# Altium PCB R20_PCBM.PcbDoc (part 1 of 2)
Units mm, origin at the board's own origin, x right, y up, seen from the top; angles counter-clockwise.
Board outline 52 x 61 mm, 4 copper layers (Top Layer, Mid-Layer 1, Mid-Layer 2, Bottom Layer); 64 components, 44 nets, 197 pads, 629 vias.
Unrouted connection lines stored in the file: 1.
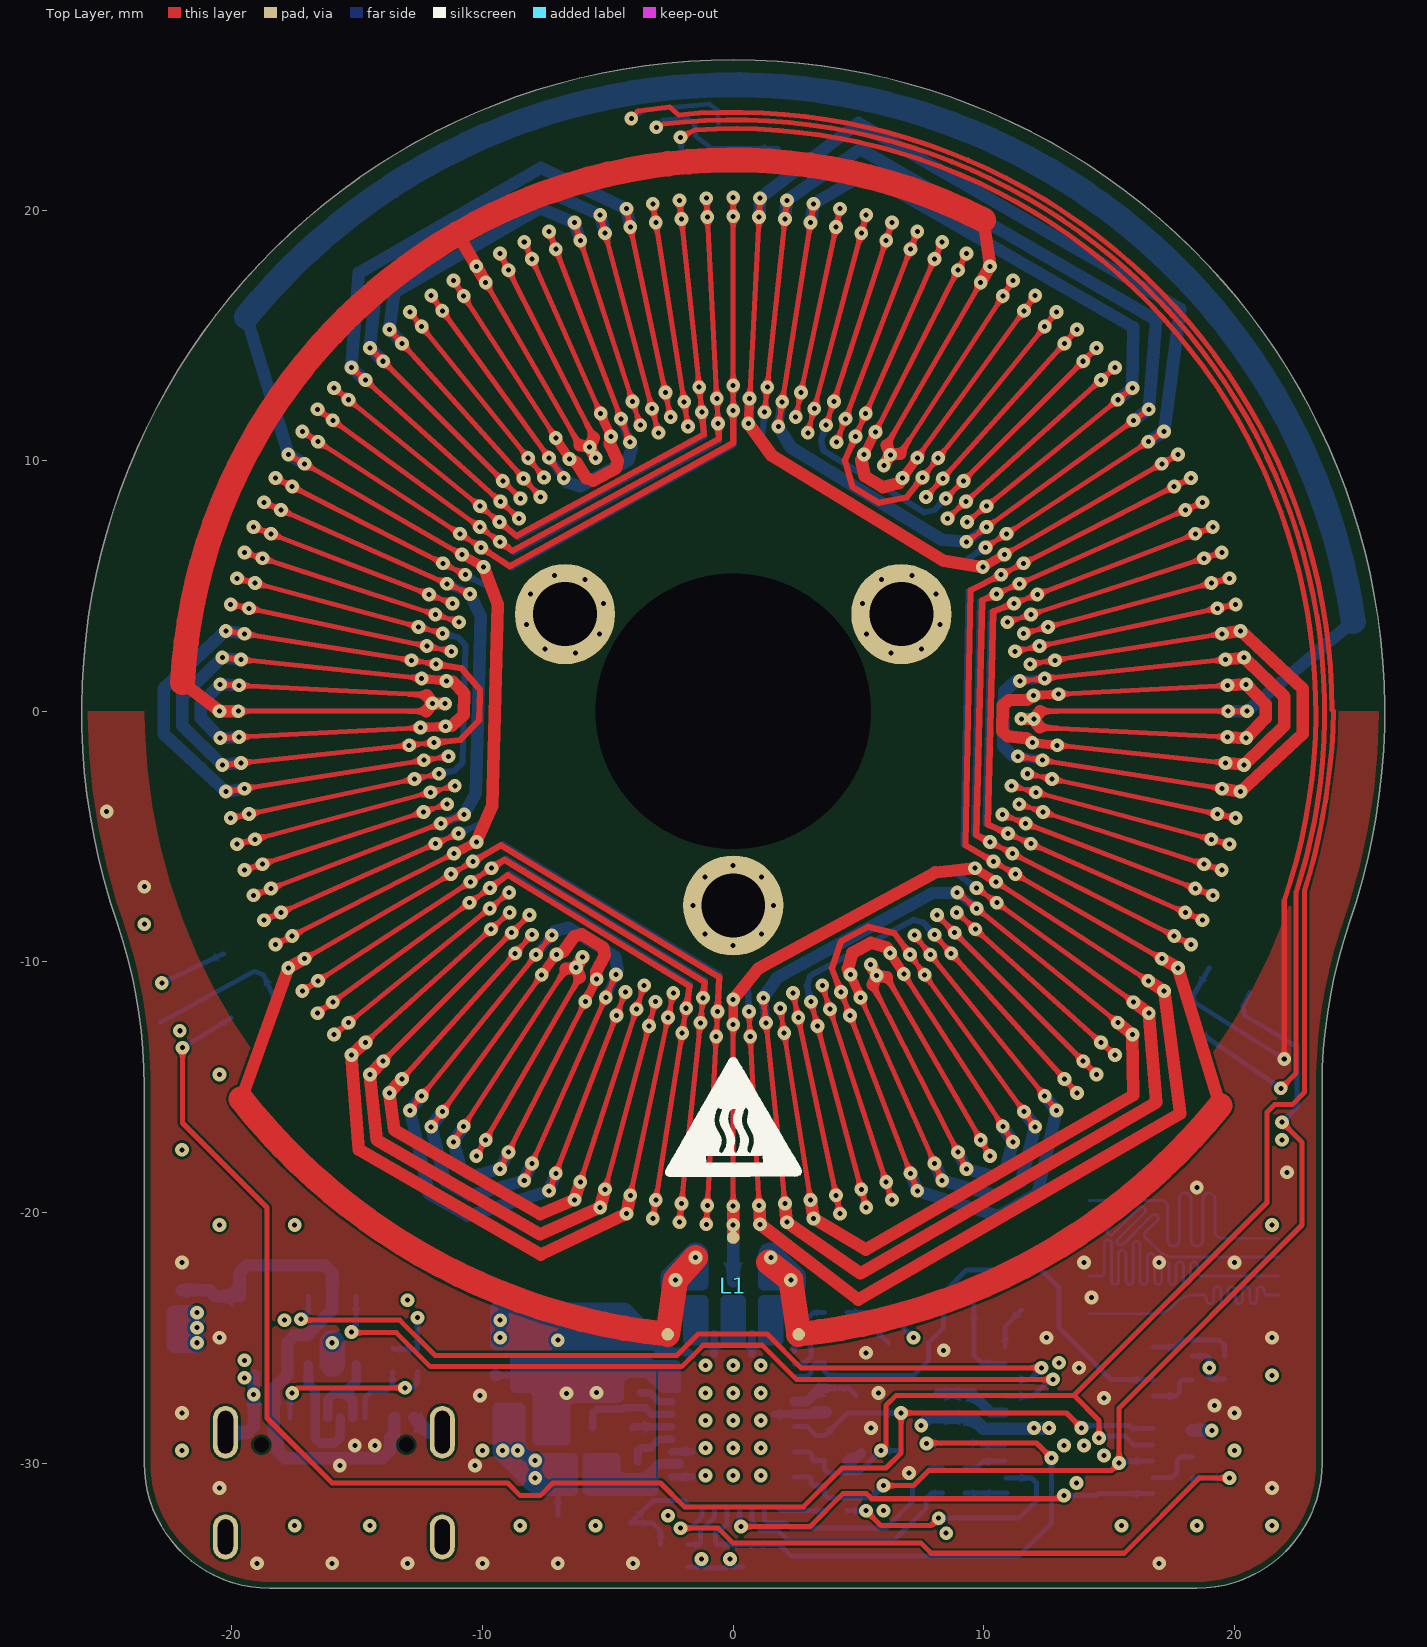
[diagram p0: Top Layer view]
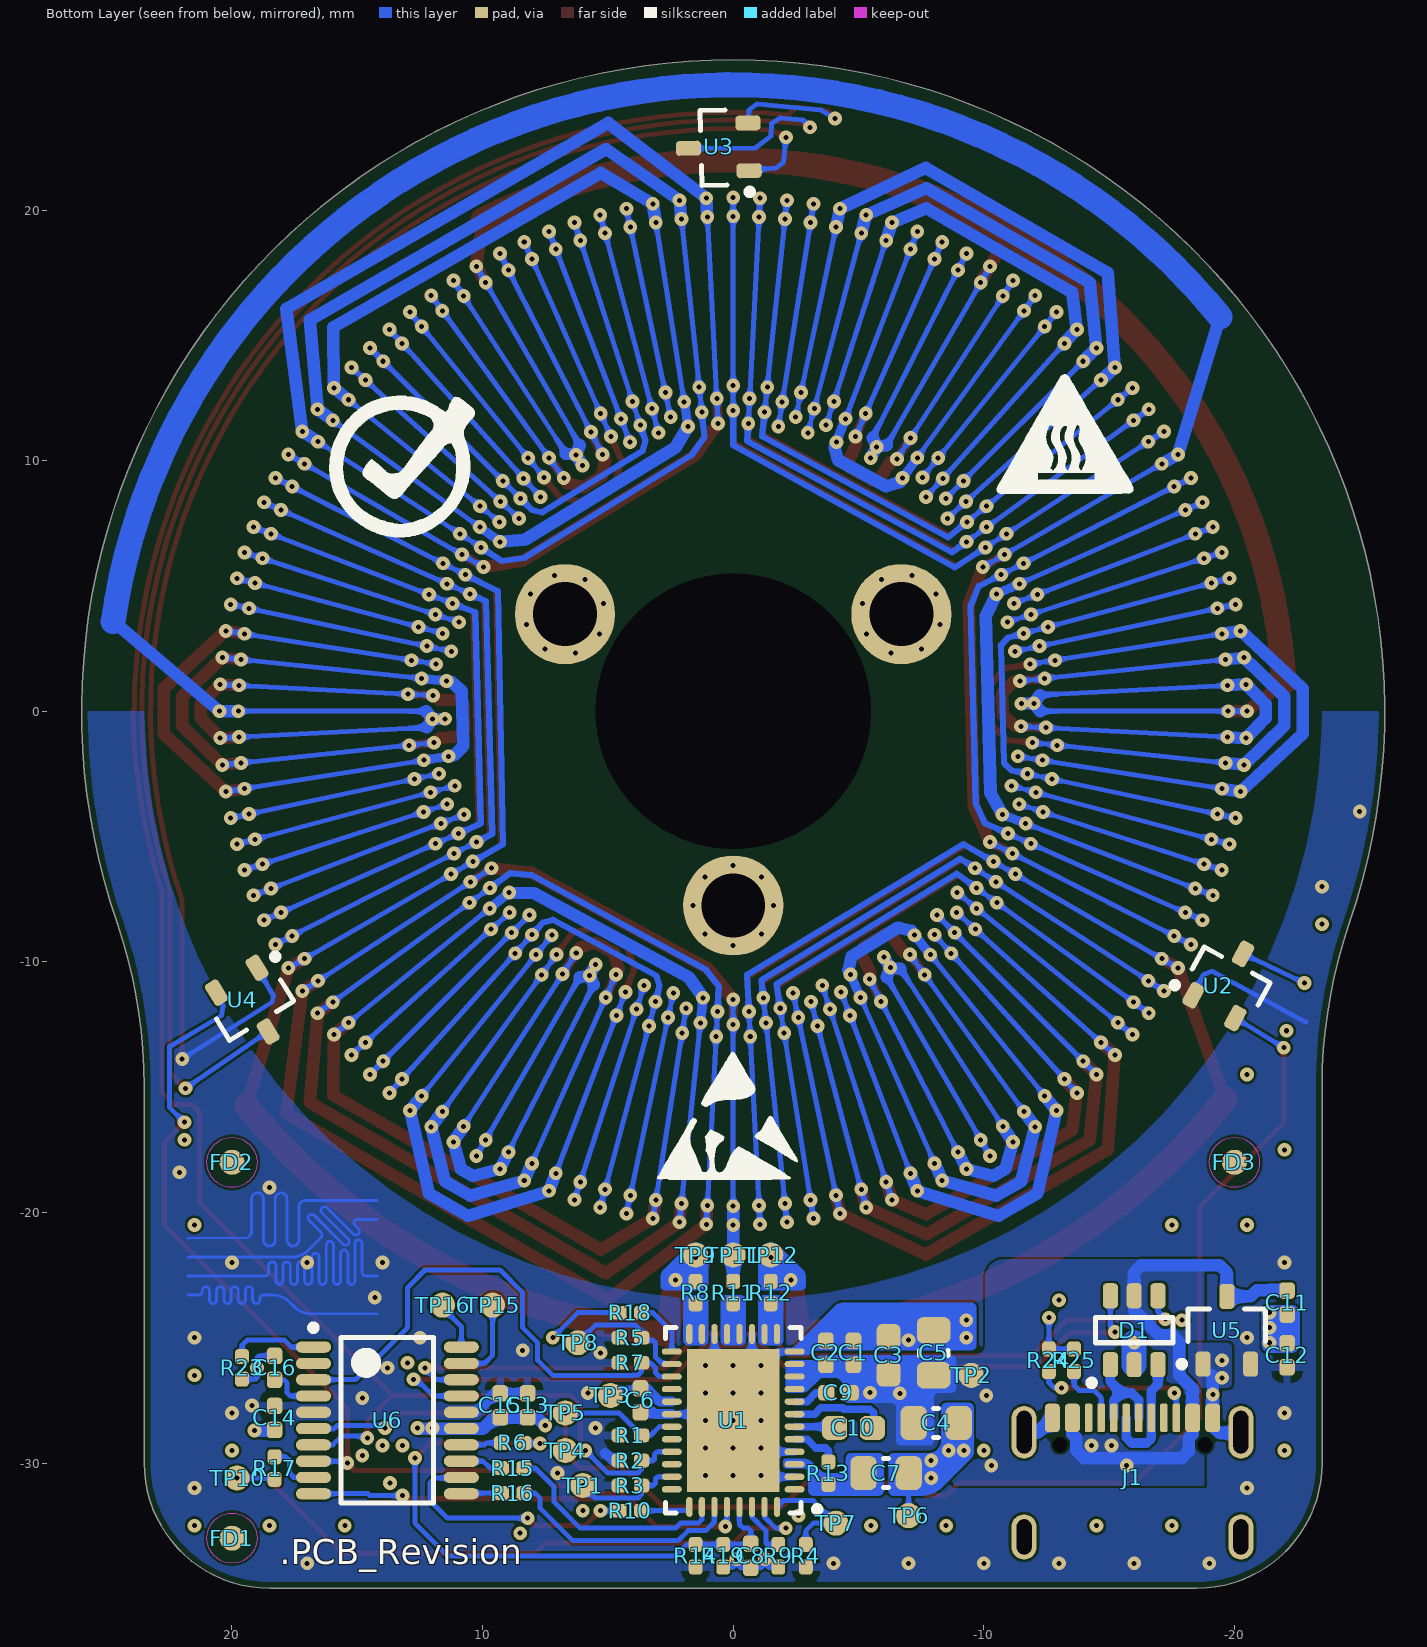
[diagram p1: Bottom Layer view, seen from below]
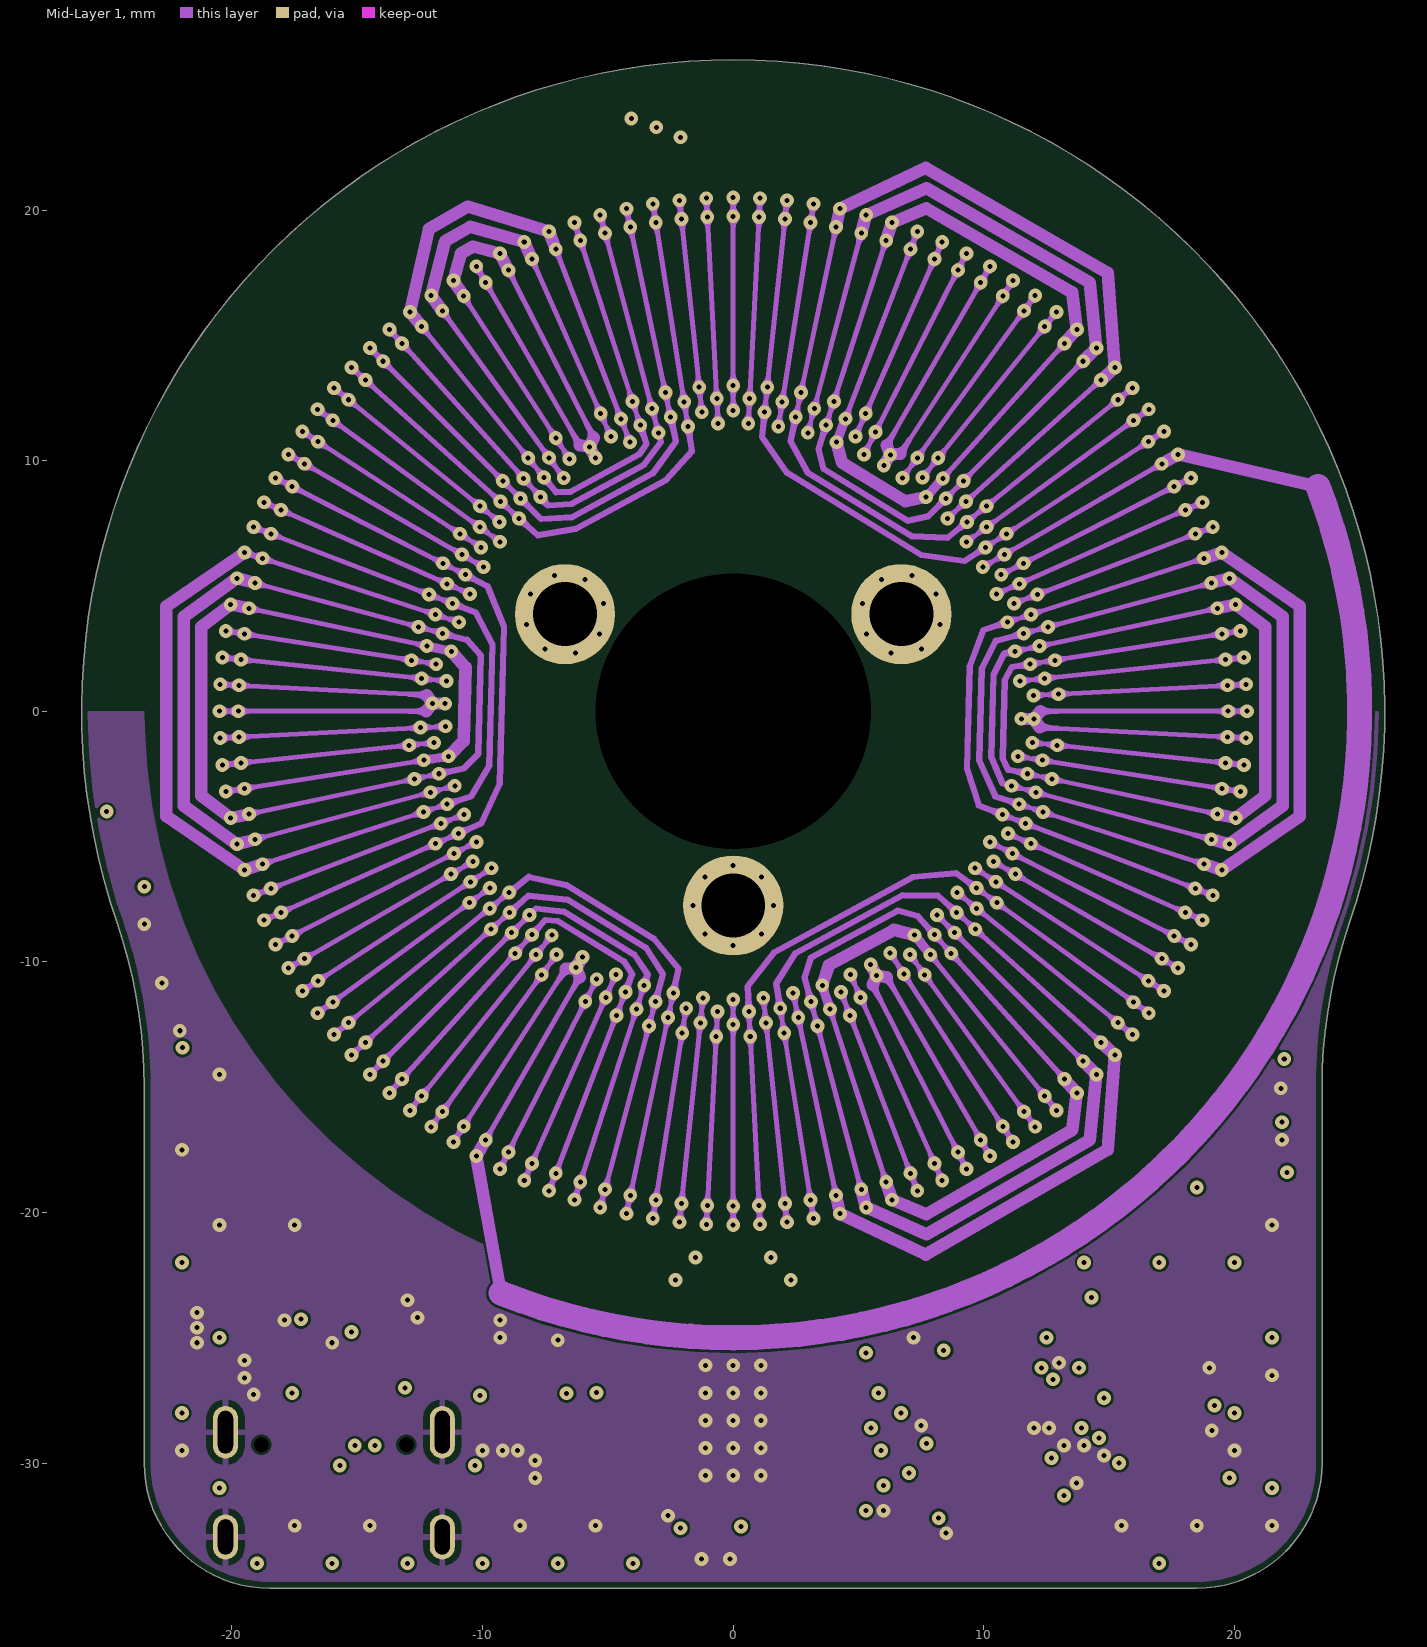
[diagram p2: Mid-Layer 1]
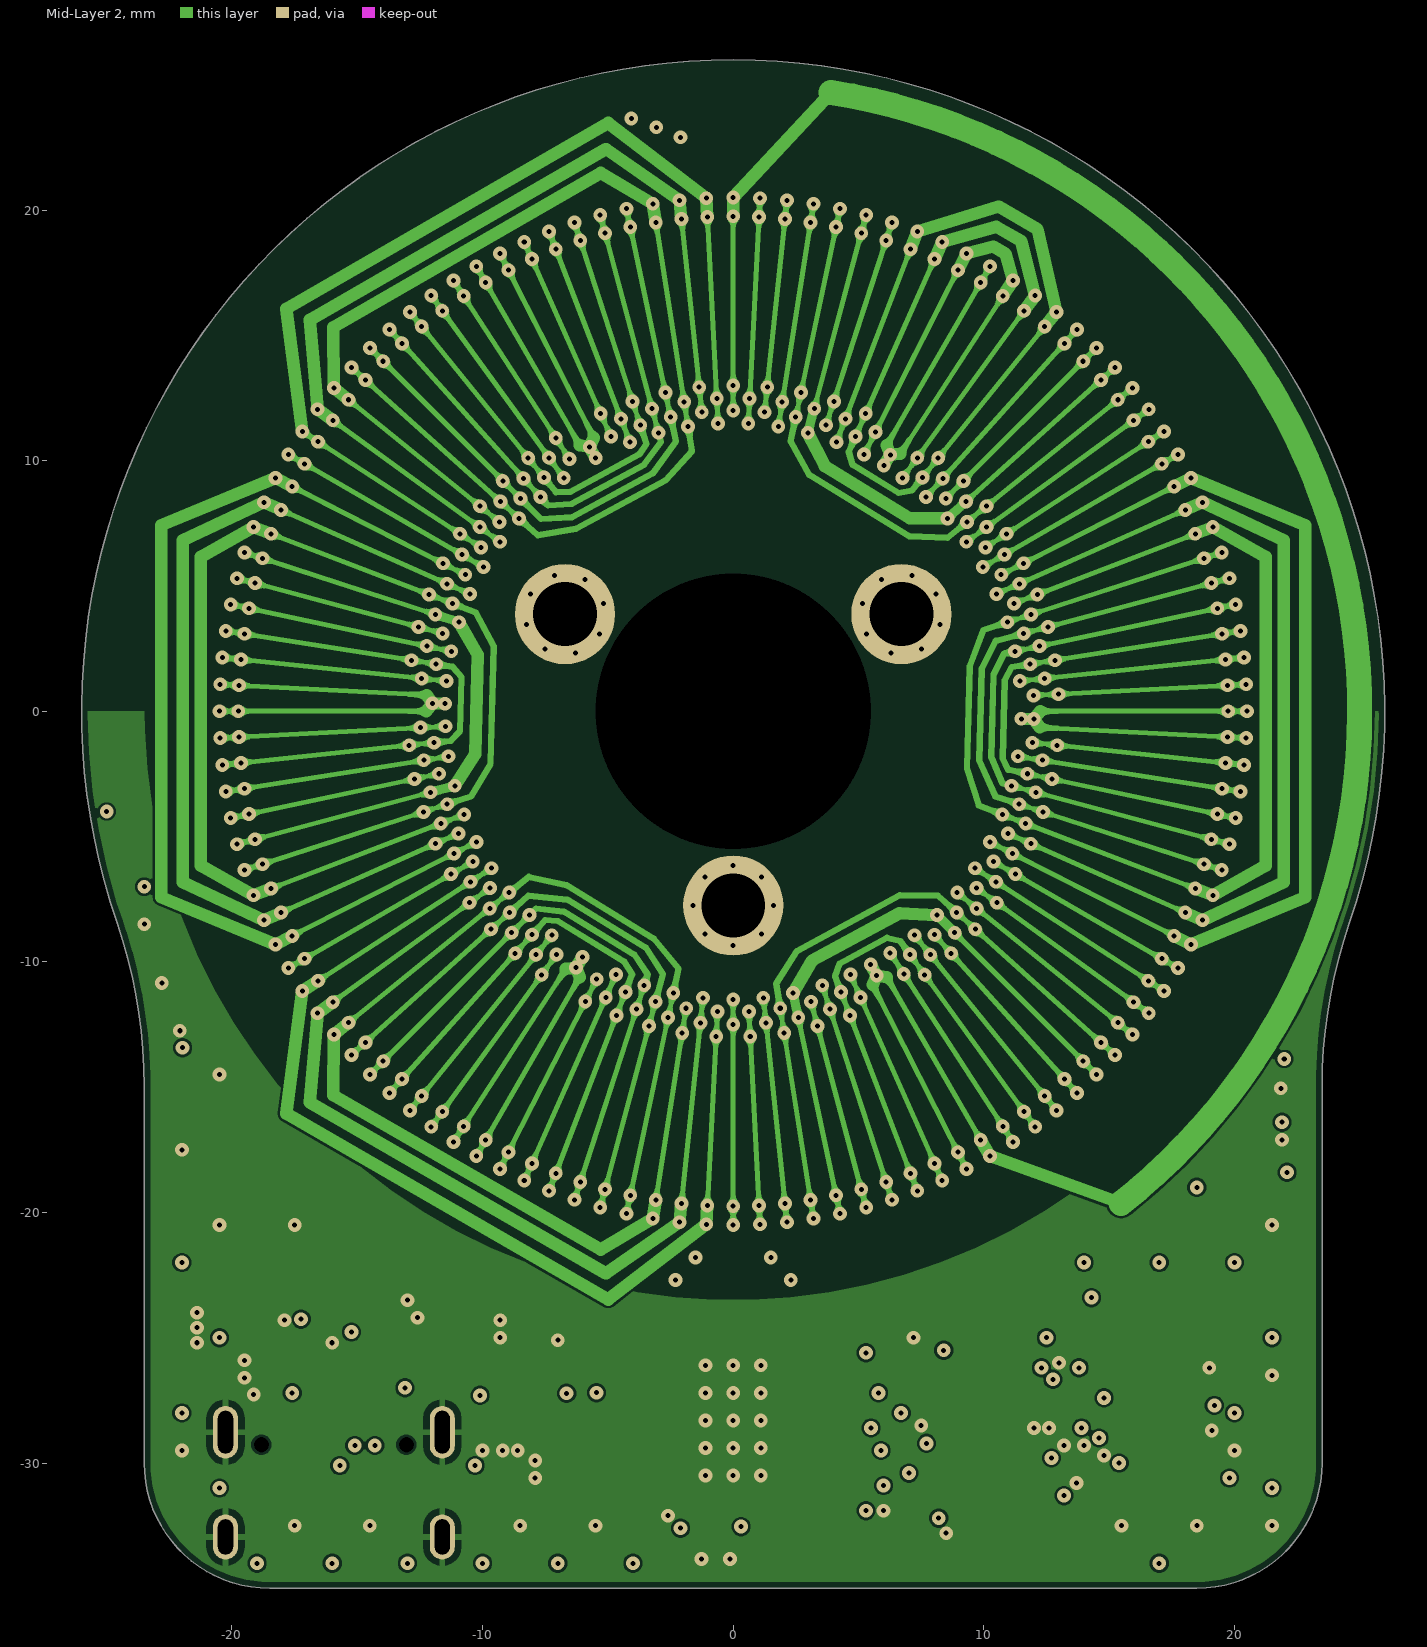
[diagram p3: Mid-Layer 2]
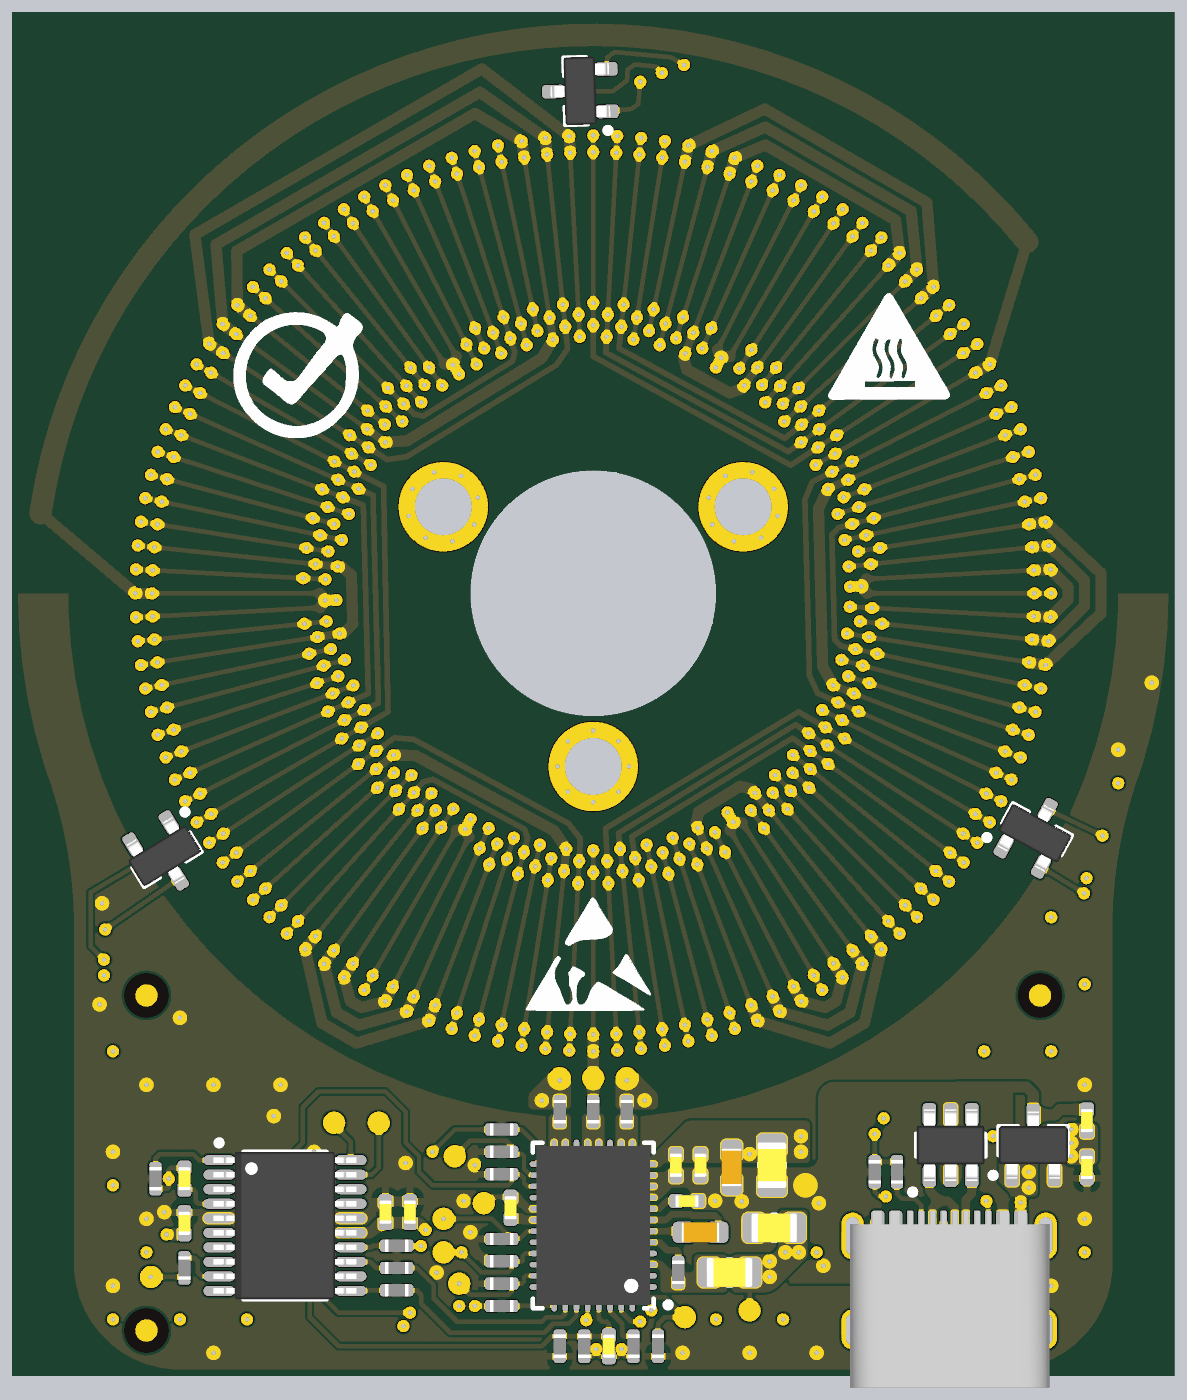
[diagram p5: 3D render of the assembled board from below, using the file's embedded part models]

## Layer stack, top to bottom
Top Solder: solder mask 0.0102, Solder Resist, Dk 3.5
Top Layer: signal copper 0.0356
Dielectric 1: dielectric 0.32, FR-4, Dk 4.8
Mid-Layer 1: signal copper 0.0356
Dielectric3: dielectric 0.32, FR-4, Dk 4.8
Mid-Layer 2: signal copper 0.0356
Dielectric2: dielectric 0.32, FR-4, Dk 4.8
Bottom Layer: signal copper 0.0356
Bottom Solder: solder mask 0.0102, Solder Resist, Dk 3.5

## Board outline
-23.5,-30 -23.5,-14.958 ccw(c-43.5,-14.958) -24.587,-8.455 cw(c0,0) 24.587,-8.455 ccw(c43.5,-14.958) 23.5,-14.958 23.5,-30 cw(c18.5,-30) 18.5,-35 -18.5,-35 cw(c-18.5,-30)

## Design rules (kind name [scope] priority, off if disabled: settings)
BoardOutlineClearance [All] p1: gap=0.254 ignorepadtopadclearanceinfootprint=FALSE
Clearance [not (InComponent('L1') or InNet('A') or InNet('B')    or InNet('C'))] p1: gap=0.1 ignorepadtopadclearanceinfootprint=FALSE
ComponentClearance [All] p1: gap=0 collisioncheckmode=3 verticalgap=2540 showdistances=FALSE
DiffPairsRouting [All] p1: maxlimit=0.5 minlimit=0.2 mostfreqgap=0.254 toplayer_minwidth=0.2 toplayer_maxwidth=0.381 toplayer_prefwidth=0.381 midlayer1_minwidth=0.2 midlayer1_maxwidth=0.381 midlayer1_prefwidth=0.381 midlayer2_minwidth=0.2 midlayer2_maxwidth=0.381 midlayer2_prefwidth=0.381 bottomlayer_minwidth=0.2 bottomlayer_maxwidth=0.381 bottomlayer_prefwidth=0.381 maxuncoupledlength=12.7
HoleSize [All] p1: absolutevalues=TRUE maxlimit=11 minlimit=0.2 maxpercent=80.000 minpercent=20.000
HoleToHoleClearance [All] p1: gap=0.2 allowstackedmicrovias=TRUE
MinimumSolderMaskSliver [All] p1: minsoldermaskwidth=0.1
NetAntennae [not (InComponent('L1') or InNet('A') or InNet('B')    or InNet('C'))] p1: netantennaetolerance=0
PolygonConnect PolygonConnect_TR [HasFootprint('C0402') or HasFootprint('C0603') or HasFootprint('R*') or IsThruPin] p1: connectstyle=Relief reliefconductorwidth=0.3 reliefentries=4 polygonreliefangle="90 Angle" airgapwidth=0.3
PolygonConnect [All] p2: connectstyle=Direct reliefconductorwidth=0.254 reliefentries=4 polygonreliefangle="90 Angle" airgapwidth=0.254
RoutingVias [All] p1: holewidth=0.3 width=0.7 viastyle="Through Hole" minholewidth=0.2 minwidth=0.55 maxholewidth=0.3 maxwidth=0.7
ShortCircuit [not (InComponent('L1') or InNet('A') or InNet('B')    or InNet('C')) vs not (InComponent('L1') or InNet('A') or InNet('B')    or InNet('C'))] p1: allowed=FALSE
SilkToSilkClearance [All] p1: silktosilkclearance=0
SilkToSolderMaskClearance [IsPad] p1: minsilkscreentomaskgap=0.15 clearancetoexposedcopper=TRUE
SolderMaskExpansion SolderMaskExpansion_via [IsVia] p1: expansion=-0.175 istentingtop=FALSE
SolderMaskExpansion [All] p2: expansion=0.05 istentingtop=FALSE
SupplyNets "Schematic Supply Nets_3" [InNet('+VBUS')] p1: voltage=0.000
SupplyNets "Schematic Supply Nets_2" [InNet('+AVDD')] p2: voltage=0.000
SupplyNets "Schematic Supply Nets_1" [InNet('GND')] p3: voltage=0.000
SupplyNets "Schematic Supply Nets" [InNet('+3V3')] p4: voltage=0.000
UnRoutedNet [not (InComponent('L1') or InNet('A') or InNet('B')    or InNet('C')) AND InAnyNet] p1: checkbadconnections=TRUE
Width [All] p1: maxlimit=1 minlimit=0.2 preferedwidth=0.2
20 further rules are at their usual default settings.

## Classes and differential pairs
differential pair USB_D: +USB_D_P -USB_D_N

## Components (designator, comment, footprint, x,y, rotation, side; value= is the part's Value field where it differs from the comment)
C1 "100n" C0402 -4.8,-25.6 r270 bottom
C2 "100n" C0402 -3.7,-25.6 r270 bottom
C3 "1u" C0603 -6.2,-25.7 r270 bottom
C4 "10u" C0805 -8.1,-28.4 r0 bottom
C5 "10u" C0805 -8,-25.6 r270 bottom
C6 "1u" C0402 3.7,-27.5 r90 bottom
C7 "10u" C0805 -6.1,-30.4 r0 bottom
C8 "100n" C0402 -0.7,-33.7 r90 bottom
C9 "1u" C0402 -4.2,-27.2 r0 bottom
C10 "47n" C0603 -4.8,-28.6 r180 bottom
C11 "1u" C0402 -22.1,-23.6 r90 bottom
C12 "4u7" C0402 -22.1,-25.7 r270 bottom
C13 "100n" C0402 8.2,-27.7 r90 bottom
C14 "100n" C0402 18.3,-28.2 r90 bottom
C15 "10n" C0402 9.3,-27.7 r90 bottom
C16 "100n" C0402 18.3,-26.2 r270 bottom
D1 "USBLC6-2SC6" USBLC6-2SC6 -16,-24.7 r90 bottom
FD1 "Fiducial" Fiducial 20,-33 r180 bottom
FD2 "Fiducial" Fiducial 20,-18 r90 bottom
FD3 "Fiducial" Fiducial -20,-18 r90 bottom
J1 "USB-C female" TYPE-C-31-M-12 -15.934,-35.06 r180 bottom
L1 "L_phase" R20_PCBM_4 0,0 r0 top locked
R1 "10k" R0402 4.1,-28.9 r0 bottom
R2 "10k" R0402 4.1,-29.9 r0 bottom
R3 "10k" R0402 4.1,-30.9 r0 bottom
R4 "10k" R0402 -2.9,-33.7 r270 bottom
R5 "10k" R0402 4.1,-25 r0 bottom
R6 "10k" R0402 8.8,-29.2 r0 bottom
R7 "10k" R0402 4.1,-26 r0 bottom
R8 "0R" R0402 1.5,-23.2 r90 bottom
R9 "10k" R0402 -1.8,-33.7 r90 bottom
R10 "33R" R0402 4.1,-31.9 r0 bottom
R11 "0R" R0402 0,-23.2 r90 bottom
R12 "0R" R0402 -1.5,-23.2 r90 bottom
R13 "22R" R0402 -3.8,-30.4 r270 bottom
R14 "15k" R0402 1.5,-33.7 r270 bottom
R15 "33R" R0402 8.8,-30.2 r180 bottom
R16 "33R" R0402 8.8,-31.2 r180 bottom
R17 "33R" R0402 18.3,-30.2 r270 bottom
R18 "10k" R0402 4.1,-24 r180 bottom
R19 "10k" R0402 0.4,-33.7 r90 bottom
R23 "1k" R0402 19.6,-26.2 r90 bottom
R24 "5k1" R0402 -12.6,-25.9 r270 bottom
R25 "5k1" R0402 -13.6,-25.9 r270 bottom
TP1 "Testing_Point_1mm" TestingPoint_1mm 6,-30.9 r90 bottom
TP2 "Testing_Point_1mm" TestingPoint_1mm -9.5,-26.5 r90 bottom
TP3 "Testing_Point_1mm" TestingPoint_1mm 4.9,-27.3 r90 bottom
TP4 "Testing_Point_1mm" TestingPoint_1mm 6.7,-29.5 r90 bottom
TP5 "Testing_Point_1mm" TestingPoint_1mm 6.7,-28 r90 bottom
TP6 "Testing_Point_1mm" TestingPoint_1mm -7,-32.1 r90 bottom
TP7 "Testing_Point_1mm" TestingPoint_1mm -4.1,-32.4 r90 bottom
TP8 "Testing_Point_1mm" TestingPoint_1mm 6.2,-25.2 r90 bottom
TP9 "Testing_Point_1mm" TestingPoint_1mm 1.5,-21.7 r90 bottom
TP10 "Testing_Point_1mm" TestingPoint_1mm 19.8,-30.6 r90 bottom
TP11 "Testing_Point_1mm" TestingPoint_1mm 0,-21.7 r90 bottom
TP12 "Testing_Point_1mm" TestingPoint_1mm -1.5,-21.7 r90 bottom
TP15 "Testing_Point_1mm" TestingPoint_1mm 9.6,-23.7 r90 bottom
TP16 "Testing_Point_1mm" TestingPoint_1mm 11.6,-23.7 r90 bottom
U1 "MCT8316ZT" QFN50P500X700X100_HS-41N 0,-28.3 r0 bottom
U2 "DRV5015" SOT95P237X112-3N -19.773,-10.736 r118.5 bottom locked
U3 "DRV5015" SOT95P237X112-3N 0.589,22.492 r358.5 bottom locked
U4 "DRV5015" SOT95P237X112-3N 19.184,-11.756 r238.5 bottom locked
U5 "3v3_reg" SOT23_torex -19.7,-24.7 r90 bottom
U6 "STM32F042" TSSOP20_ST 13.8,-28.3 r180 bottom

## Footprints (in the part's own frame and the unit in brackets; to place one, negate y for a bottom-side part, rotate by r counter-clockwise, add the part's x,y. Pads: shape width x height; smd on the part's side, far side on the other; paste and mask are expansions set on the pad)
C0402 [mm] "Chip Capacitor, 2-Leads, Body 1.00x0.50mm, IPC Medium Density"
  rrect50% 0.66x0.62 smd mask+0.05: 1(-0.48,0) 2(0.48,0)
  body extent -0.53,-0.28 0.53,0.28, height 0.55
C0603 [mm] "Chip Capacitor, 2-Leads, Body 1.60x0.80mm, IPC Medium Density"
  rrect50% 1x0.95 smd: 1(-0.75,0) 2(0.75,0)
  body extent -0.85,-0.45 0.85,0.45, height 0.9
C0805 [mm] "Chip Capacitor, 2-Leads, Body 2.00x1.25mm, IPC Medium Density"
  rrect50% 1.05x1.35 smd: 1(-0.9,0) 2(0.9,0)
  silkscreen extent -0.1,-0.58 0.1,0.58, body extent -1.02,-0.65 1.02,0.65, height 0.6
Fiducial [mm]
  round 1 smd paste-1: 1(0,0)
  Top Layer keep-out region: -1,0 -0.924,0.383 -0.707,0.707 -0.383,0.924 0,1 0,1 0.383,0.924 0.707,0.707 0.924,0.383 1,0 1,0 0.924,-0.383 0.707,-0.707 0.383,-0.924 0,-1 0,-1 -0.383,-0.924 -0.707,-0.707 -0.924,-0.383 -1,0
QFN50P500X700X100_HS-41N [mm] "QFN, 40-Leads, Body 5.00x7.00mm, Pitch 0.50mm, Thermal Pad 3.70x5.70mm, IPC Medium Density"
  oval 0.8x0.25 smd: 1(-2.45,2.75) 2(-2.45,2.25) 3(-2.45,1.75) 4(-2.45,1.25) 5(-2.45,0.75) 6(-2.45,0.25) 7(-2.45,-0.25) 8(-2.45,-0.75) 9(-2.45,-1.25) 10(-2.45,-1.75) 11(-2.45,-2.25) 12(-2.45,-2.75) 21(2.45,-2.75) 22(2.45,-2.25) 23(2.45,-1.75) 24(2.45,-1.25) 25(2.45,-0.75) 26(2.45,-0.25) 27(2.45,0.25) 28(2.45,0.75) 29(2.45,1.25) 30(2.45,1.75) 31(2.45,2.25) 32(2.45,2.75)
  oval 0.25x0.8 smd: 13(-1.75,-3.45) 14(-1.25,-3.45) 15(-0.75,-3.45) 16(-0.25,-3.45) 17(0.25,-3.45) 18(0.75,-3.45) 19(1.25,-3.45) 20(1.75,-3.45) 33(1.75,3.45) 34(1.25,3.45) 35(0.75,3.45) 36(0.25,3.45) 37(-0.25,3.45) 38(-0.75,3.45) 39(-1.25,3.45) 40(-1.75,3.45)
  rect 3.7x5.7 smd: 41(0,0)
  silkscreen extent -3.47,-3.7 2.7,3.7, body extent -2.55,-3.55 2.55,3.55, height 1
R20_PCBM_4 [mm]
  round 0.5 smd paste-2539.97 mask+0.102: A(-2.613,-24.863) B(0,-21) C(2.613,-24.863)
  Top Layer lines w0.2: -20.5,0 -12.25,0 ; -20.472,-1.073 -11.484,-0.602 ; -20.472,1.073 -12.233,0.641 ; -20.388,-2.143 -11.934,-1.254 ; -20.388,2.143 -11.437,1.202 ; -20.248,-3.207 -11.358,-1.799 ; -20.248,3.207 -11.852,1.877 ; -20.052,-4.262 -11.738,-2.495 ; -20.052,4.262 -11.249,2.391 ; -19.801,-5.306 -11.108,-2.976 ; -19.801,5.306 -11.591,3.106 ; -19.497,-6.335 -11.413,-3.708 ; -19.497,6.335 -10.937,3.554 ; -19.138,-7.347 -10.736,-4.121 ; -19.138,7.347 -11.203,4.3 ; -18.728,-8.338 -10.963,-4.881 ; -18.728,8.338 -10.506,4.677 ; -18.266,-9.307 -10.247,-5.221 ; -18.266,9.307 -10.692,5.448 ; -17.754,-10.25 -10.392,-6 ; -17.754,10.25 -9.959,5.75 ; -17.193,-11.165 -9.645,-6.263 ; -17.193,11.165 -10.064,6.536 ; -16.585,-12.05 -9.708,-7.053 ; -16.585,12.05 -9.304,6.76 ; -15.931,-12.901 -8.937,-7.237 ; -15.931,12.901 -9.326,7.552 ; -15.234,-13.717 -8.918,-8.03 ; -15.234,13.717 -8.546,7.695 ; -14.496,-14.496 -8.132,-8.132 ; -14.496,14.496 -8.485,8.485 ; -13.717,-15.234 -8.03,-8.918 ; -13.717,15.234 -7.695,8.546 ; -12.901,-15.931 -7.237,-8.937 ; -12.901,15.931 -7.552,9.326 ; -12.05,-16.585 -7.053,-9.708 ; -12.05,16.585 -6.76,9.304 ; -11.165,-17.193 -6.672,-10.274 ; -11.165,17.193 -6.536,10.064 ; -10.25,-17.754 -6.125,-10.609 ; -10.25,17.754 -6.125,10.609 ; -9.307,-18.266 -5.448,-10.692 ; -9.307,18.266 -5.561,10.915 ; -8.338,-18.728 -4.677,-10.506 ; -8.338,18.728 -4.881,10.963 ; -7.347,-19.138 -4.3,-11.203 ; -7.347,19.138 -4.121,10.736 ; -6.335,-19.497 -3.554,-10.937 ; -6.335,19.497 -3.708,11.413 ; -5.306,-19.801 -3.106,-11.591 ; -5.306,19.801 -2.976,11.108 ; -4.262,-20.052 -2.391,-11.249 ; -4.262,20.052 -2.495,11.738 ; -3.207,-20.248 -1.877,-11.852 ; -3.207,20.248 -1.799,11.358 ; -2.143,-20.388 -1.202,-11.437 ; -2.143,20.388 -1.254,11.934 ; -1.073,-20.472 -0.628,-11.984 ; -1.073,20.472 -0.602,11.484 ; 0,-20.5 0,-11.5 ; 0,12 0,20.5 ; 0.602,11.484 1.073,20.472 ; 0.628,-11.984 1.073,-20.472 ; 1.202,-11.437 2.143,-20.388 ; 1.254,11.934 2.143,20.388 ; 1.799,11.358 3.207,20.248 ; 1.877,-11.852 3.207,-20.248 ; 2.391,-11.249 4.262,-20.052 ; 2.495,11.738 4.262,20.052 ; 2.976,11.108 5.306,19.801 ; 3.106,-11.591 5.306,-19.801 ; 3.554,-10.937 6.335,-19.497 ; 3.708,11.413 6.335,19.497 ; 4.121,10.736 7.347,19.138 ; 4.3,-11.203 7.347,-19.138 ; 4.677,-10.506 8.338,-18.728 ; 4.881,10.963 8.338,18.728 ; 5.221,10.247 9.307,18.266 ; 5.561,-10.915 9.307,-18.266 ; 6.125,-10.609 10.25,-17.754 ; 6.125,10.609 10.25,17.754 ; 6.263,-9.645 11.165,-17.193 ; 6.672,10.274 11.165,17.193 ; 6.76,9.304 12.05,16.585 ; 7.053,-9.708 12.05,-16.585 ; 7.237,-8.937 12.901,-15.931 ; 7.552,9.326 12.901,15.931 ; 7.695,8.546 13.717,15.234 ; 8.03,-8.918 13.717,-15.234 ; 8.132,-8.132 14.496,-14.496 ; 8.485,8.485 14.496,14.496 ; 8.546,7.695 15.234,13.717 ; 8.918,-8.03 15.234,-13.717 ; 8.937,-7.237 15.931,-12.901 ; 9.304,6.76 16.585,12.05 ; 9.326,7.552 15.931,12.901 ; 9.645,-6.263 17.193,-11.165 ; 9.708,-7.053 16.585,-12.05 ; 9.959,5.75 17.754,10.25 ; 10.064,6.536 17.193,11.165 ; 10.247,-5.221 18.266,-9.307 ; 10.392,-6 17.754,-10.25 ; 10.506,4.677 18.728,8.338 ; 10.692,5.448 18.266,9.307 ; 10.736,-4.121 19.138,-7.347 ; 10.937,3.554 19.497,6.335 ; 10.963,-4.881 18.728,-8.338 ; 11.108,-2.976 19.801,-5.306 ; 11.203,4.3 19.138,7.347 ; 11.249,2.391 20.052,4.262 ; 11.358,-1.799 20.248,-3.207 ; 11.413,-3.708 19.497,-6.335 ; 11.437,1.202 20.388,2.143 ; 11.591,3.106 19.801,5.306 ; 11.738,-2.495 20.052,-4.262 ; 11.852,1.877 20.248,3.207 ; 11.934,-1.254 20.388,-2.143 ; 11.984,0.628 20.472,1.073 ; 12.233,-0.641 20.472,-1.073 ; 12.25,0 20.5,0
  Top Layer lines w0.25: -11.934,-1.254 -10.89,-1.145 -10.138,-0.358 -10.106,0.861 -10.843,1.717 -11.852,1.877 ; -10.392,-6 -9.27,-5.352 -0.556,-10.614 -0.628,-11.984 ; -10.064,6.536 -8.914,5.789 0,10.704 0,12 ; -9.708,-7.053 -8.995,-6.535 -1.739,-10.981 -1.877,-11.852 ; -9.645,-6.263 -9.126,-5.927 -1.137,-10.822 -1.202,-11.437 ; -9.326,7.552 -8.64,6.997 -1.162,11.057 -1.254,11.934 ; -9.304,6.76 -8.804,6.396 -0.57,10.867 -0.602,11.484 ; 4.3,-11.203 3.934,-10.249 4.308,-9.182 5.379,-8.601 6.436,-8.858 7.053,-9.708 ; 4.881,10.963 4.454,10.003 4.759,8.959 5.798,8.322 6.909,8.532 7.552,9.326 ; 10.247,-5.221 9.696,-4.94 9.941,4.426 10.506,4.677 ; 10.392,-6 9.27,-5.352 9.47,4.825 10.692,5.448 ; 10.963,-4.881 10.157,-4.522 10.379,3.984 11.203,4.3
  Top Layer lines w0.35: -12.483,-0.654 -11.484,-0.602 ; -12.431,1.307 -11.437,1.202 ; -11.138,-5.675 -10.247,-5.221 ; -10.825,6.25 -9.959,5.75 ; -7.641,-10.517 -7.053,-9.708 ; -7.08,10.903 -6.536,10.064 ; -5.902,-11.583 -5.448,-10.692 ; -5.288,11.876 -4.881,10.963 ; 0,-12.5 0,-11.5 ; 0.602,11.484 0.654,12.483 ; 4.677,-10.506 5.084,-11.419 ; 5.221,10.247 5.675,11.138 ; 6.263,-9.645 6.808,-10.483 ; 6.76,9.304 7.347,10.113 ; 9.645,-6.263 10.483,-6.808 ; 9.959,5.75 10.825,6.25 ; 11.934,-1.254 12.929,-1.359 ; 11.984,0.628 12.982,0.68
  Top Layer lines w0.5: -21.97,1.151 -20.5,0 -19.75,0 ; -19.633,-15.477 -17.753,-10.25 -17.104,-9.875 ; -14.677,-13.215 -15.234,-13.717 -14.937,-17.489 -7.678,-21.681 -4.262,-20.052 -4.106,-19.318 ; -13.965,-13.965 -14.496,-14.496 -14.227,-17.107 -7.701,-20.875 -5.306,-19.801 -5.112,-19.077 ; -13.215,-14.677 -13.717,-15.234 -13.53,-16.709 -7.705,-20.072 -6.335,-19.497 -6.103,-18.783 ; -12.25,0 -11.996,0.314 ; -12.233,0.641 -11.996,0.314 ; -11.496,0.301 -11.996,0.314 ; -11.484,-0.602 -11.235,-0.589 -10.749,-0.141 -10.727,0.703 -11.188,1.176 -11.437,1.202 ; -11,19.053 -10.25,17.754 -9.875,17.104 ; -10.247,-5.221 -9.607,-3.77 -9.396,4.268 -9.959,5.75 ; -7.053,-9.708 -6.781,-9.596 -6.349,-8.983 -6.051,-8.9 -5.182,-9.432 -5.122,-9.735 -5.471,-10.399 -5.448,-10.692 ; -6.672,-10.274 -6.27,-10.232 ; -6.536,10.064 -6.27,9.937 -5.87,9.303 -5.577,9.204 -4.681,9.69 -4.605,9.99 -4.919,10.671 -4.881,10.963 ; -6.125,-10.609 -6.27,-10.232 ; -6.125,10.609 -5.726,10.546 ; -6.009,-9.805 -6.27,-10.232 ; -5.561,10.915 -5.726,10.546 ; -5.487,10.106 -5.726,10.546 ; 0,-21 0,-20.5 0,-20 0,-19.75 ; 0,-11.5 1.002,-10.271 8.068,-6.435 9.645,-6.263 ; 0.602,11.484 1.538,10.205 8.394,6.004 9.959,5.75 ; 1.034,-19.723 1.073,-20.472 4.99,-23.475 17.835,-16.059 17.193,-11.165 16.564,-10.757 ; 2.064,-19.642 2.143,-20.388 ; 3.09,-19.507 3.207,-20.248 5.29,-21.483 15.96,-15.323 15.931,-12.901 15.349,-12.429 ; 4.677,-10.506 4.576,-10.277 4.755,-9.641 5.496,-9.239 6.127,-9.435 6.263,-9.645 ; 5.221,10.247 5.107,10.024 5.253,9.379 5.972,8.938 6.613,9.101 6.76,9.304 ; 5.487,-10.106 5.726,-10.546 ; 5.561,-10.915 5.726,-10.546 ; 6.009,9.805 6.27,10.232 ; 6.125,-10.609 5.726,-10.546 ; 6.125,10.609 6.27,10.232 ; 6.672,10.274 6.27,10.232 ; 9.875,17.104 10.25,17.753 9.988,19.602 ; 11.496,-0.301 11.996,-0.314 ; 11.934,-1.254 11.701,-1.075 10.954,-1.007 10.733,-0.791 10.76,0.228 10.991,0.432 11.741,0.461 11.984,0.628 ; 12.233,-0.641 11.996,-0.314 ; 12.25,0 11.996,-0.314 ; 15.978,-11.609 16.585,-12.05 16.889,-15.612 5.076,-22.433 2.143,-20.388 ; 17.104,-9.875 17.753,-10.25 19.429,-15.733 ; 19.507,-3.09 20.248,-3.207 22.732,-0.893 22.732,0.893 20.248,3.207 19.507,3.09 ; 19.642,-2.064 20.388,-2.143 21.992,-0.576 21.992,0.576 20.388,2.143 19.642,2.064 ; 19.723,-1.034 20.472,-1.073 21.248,-0.278 21.248,0.278 20.472,1.073 19.723,1.034 ; 2.143,-20.388 2.143,-20.388
  Top Layer lines w1: -21.97,1.151 cw(c0,0) 9.988,19.602 ; -19.633,-15.477 ccw(c0,0) -2.613,-24.863 ; 2.613,-24.863 ccw(c0,0) 19.429,-15.733
  Mid-Layer 1 lines w0.2: -20.5,0 -12.25,0 ; -20.472,-1.073 -11.484,-0.602 ; -20.472,1.073 -12.233,0.641 ; -20.388,-2.143 -11.934,-1.254 ; -20.388,2.143 -11.437,1.202 ; -20.248,-3.207 -11.358,-1.799 ; -20.248,3.207 -11.852,1.877 ; -20.052,-4.262 -11.738,-2.495 ; -20.052,4.262 -11.738,2.495 -11.249,2.391 ; -19.801,-5.306 -11.108,-2.976 ; -19.801,5.306 -11.591,3.106 ; -19.497,-6.335 -11.413,-3.708 ; -19.497,6.335 -10.937,3.554 ; -19.138,-7.347 -10.736,-4.121 ; -19.138,7.347 -11.203,4.3 ; -18.728,-8.338 -10.963,-4.881 ; -18.728,8.338 -10.506,4.677 ; -18.266,-9.307 -10.247,-5.221 ; -18.266,9.307 -10.692,5.448 ; -17.754,-10.25 -10.392,-6 ; -17.754,10.25 -9.959,5.75 ; -17.193,-11.165 -9.645,-6.263 ; -17.193,11.165 -10.064,6.536 ; -16.585,-12.05 -9.708,-7.053 ; -16.585,12.05 -9.304,6.76 ; -15.931,-12.901 -8.937,-7.237 ; -15.931,12.901 -9.326,7.552 ; -15.234,-13.717 -8.918,-8.03 ; -15.234,13.717 -8.546,7.695 ; -14.496,-14.496 -8.132,-8.132 ; -14.496,14.496 -8.485,8.485 ; -13.717,-15.234 -8.03,-8.918 ; -13.717,15.234 -7.695,8.546 ; -12.901,-15.931 -7.237,-8.937 ; -12.901,15.931 -7.552,9.326 ; -12.05,-16.585 -7.053,-9.708 ; -12.05,16.585 -6.76,9.304 ; -11.165,-17.193 -6.672,-10.274 ; -11.165,17.193 -6.536,10.064 ; -10.25,-17.754 -6.125,-10.609 ; -10.25,17.754 -6.125,10.609 ; -9.307,-18.266 -5.448,-10.692 ; -9.307,18.266 -5.561,10.915 ; -8.338,-18.728 -4.677,-10.506 ; -8.338,18.728 -4.881,10.963 ; -7.347,-19.138 -4.3,-11.203 ; -7.347,19.138 -4.121,10.736 ; -6.335,-19.497 -3.554,-10.937 ; -6.335,19.497 -3.708,11.413 ; -5.306,-19.801 -3.106,-11.591 ; -5.306,19.801 -2.976,11.108 ; -4.262,-20.052 -2.391,-11.249 ; -4.262,20.052 -2.495,11.738 ; -3.207,-20.248 -1.877,-11.852 ; -3.207,20.248 -1.799,11.358 ; -2.143,-20.388 -1.202,-11.437 ; -2.143,20.388 -1.254,11.934 ; -1.073,-20.472 -0.628,-11.984 ; -1.073,20.472 -0.602,11.484 ; 0,-20.5 0,-11.5 ; 0,12 0,20.5 ; 0.602,11.484 1.073,20.472 ; 0.628,-11.984 1.073,-20.472 ; 1.202,-11.437 2.143,-20.388 ; 1.254,11.934 2.143,20.388 ; 1.799,11.358 3.207,20.248 ; 1.877,-11.852 3.207,-20.248 ; 2.391,-11.249 4.262,-20.052 ; 2.495,11.738 4.262,20.052 ; 2.976,11.108 5.306,19.801 ; 3.106,-11.591 5.306,-19.801 ; 3.554,-10.937 3.708,-11.413 6.335,-19.497 ; 3.708,11.413 6.335,19.497 ; 4.121,10.736 7.347,19.138 ; 4.3,-11.203 7.347,-19.138 ; 4.677,-10.506 8.338,-18.728 ; 4.881,10.963 8.338,18.728 ; 5.221,10.247 9.307,18.266 ; 5.561,-10.915 9.307,-18.266 ; 6.125,-10.609 10.25,-17.754 ; 6.125,10.609 10.25,17.754 ; 6.263,-9.645 11.165,-17.193 ; 6.672,10.274 11.165,17.193 ; 6.76,9.304 12.05,16.585 ; 7.053,-9.708 12.05,-16.585 ; 7.237,-8.937 12.901,-15.931 ; 7.552,9.326 12.901,15.931 ; 7.695,8.546 8.03,8.918 13.717,15.234 ; 8.03,-8.918 13.717,-15.234 ; 8.132,-8.132 14.496,-14.496 ; 8.485,8.485 14.496,14.496 ; 8.546,7.695 15.234,13.717 ; 8.918,-8.03 15.234,-13.717 ; 8.937,-7.237 15.931,-12.901 ; 9.304,6.76 16.585,12.05 ; 9.326,7.552 15.931,12.901 ; 9.645,-6.263 17.193,-11.165 ; 9.708,-7.053 16.585,-12.05 ; 9.959,5.75 17.754,10.25 ; 10.064,6.536 17.193,11.165 ; 10.247,-5.221 18.266,-9.307 ; 10.392,-6 17.754,-10.25 ; 10.506,4.677 18.728,8.338 ; 10.692,5.448 18.266,9.307 ; 10.736,-4.121 19.138,-7.347 ; 10.937,3.554 19.497,6.335 ; 10.963,-4.881 18.728,-8.338 ; 11.108,-2.976 19.801,-5.306 ; 11.203,4.3 19.138,7.347 ; 11.249,2.391 20.052,4.262 ; 11.358,-1.799 20.248,-3.207 ; 11.413,-3.708 19.497,-6.335 ; 11.437,1.202 20.388,2.143 ; 11.591,3.106 19.801,5.306 ; 11.738,-2.495 20.052,-4.262 ; 11.852,1.877 20.248,3.207 ; 11.934,-1.254 20.388,-2.143 ; 11.984,0.628 20.472,1.073 ; 12.233,-0.641 20.472,-1.073 ; 12.25,0 20.5,0
  Mid-Layer 1 lines w0.25: -11.738,-2.495 -10.76,-2.287 -10.173,-1.708 -10.07,2.238 -10.625,2.847 -11.591,3.106 ; -11.413,-3.708 -10.462,-3.399 -9.735,-2.175 -9.607,2.682 -10.269,3.942 -11.203,4.3 ; -10.963,-4.881 -10.049,-4.474 -9.311,-2.894 -9.147,3.377 -9.801,4.994 -10.692,5.448 ; -8.937,-7.237 -8.16,-6.608 -6.643,-6.942 -3.17,-9.071 -2.183,-10.271 -2.391,-11.249 ; -8.918,-8.03 -8.175,-7.36 -6.612,-7.524 -3.483,-9.441 -2.808,-10.481 -3.106,-11.591 ; -8.546,7.695 -7.803,7.026 -6.271,7.281 -2.691,9.224 -1.643,10.371 -1.799,11.358 ; -8.485,8.485 -7.673,7.673 -6.435,7.737 -3.21,9.488 -2.287,10.76 -2.495,11.738 ; -8.132,-8.132 -7.867,-7.867 -6.748,-8 -3.941,-9.72 -3.414,-10.508 -3.554,-10.937 ; -8.03,-8.918 -7.501,-8.33 -7.002,-8.372 -4.342,-10.002 -4.032,-10.503 ; -7.695,8.546 -7.393,8.211 -6.447,8.273 -3.554,9.843 -2.88,10.747 -2.976,11.108 ; -7.552,9.326 -7.08,8.743 ; -4.3,-11.203 -4.032,-10.503 ; -3.708,11.413 -3.464,10.661 -3.749,10.249 -6.491,8.761 -7.08,8.743 ; 0.628,-11.984 0.576,-10.985 1.649,-9.61 7.161,-6.617 8.899,-6.466 9.708,-7.053 ; 1.254,11.934 1.15,10.94 2.15,9.51 7.498,6.233 9.225,5.991 10.064,6.536 ; 1.877,-11.852 1.721,-10.865 2.481,-9.661 6.751,-7.343 8.175,-7.36 8.918,-8.03 ; 2.495,11.738 2.287,10.76 2.983,9.518 7.126,6.979 8.549,6.923 9.326,7.552 ; 3.106,-11.591 2.847,-10.625 3.097,-9.84 6.566,-7.956 7.36,-8.175 8.03,-8.918 ; 3.708,11.413 3.399,10.462 3.607,9.665 6.973,7.602 7.778,7.778 8.485,8.485 ; 10.736,-4.121 9.803,-3.763 9.334,-2.282 9.44,1.79 9.986,3.245 10.937,3.554 ; 11.108,-2.976 10.747,-2.88 10.302,-1.844 10.388,1.447 10.807,2.297 11.249,2.391 ; 11.413,-3.708 10.462,-3.399 9.822,-1.964 9.918,1.704 10.481,2.808 11.591,3.106 ; 11.738,-2.495 10.965,-2.331 10.751,-1.878 10.833,1.241 11.112,1.76 ; 11.852,1.877 11.112,1.76 ; -7.08,8.743 -7.08,8.743 ; -4.032,-10.503 -4.032,-10.503 ; 11.112,1.76 11.112,1.76
  Mid-Layer 1 lines w0.35: -12.346,-1.955 -11.358,-1.799 ; -12.227,2.599 -11.249,2.391 ; 3.554,-10.937 3.863,-11.888 ; 4.121,10.736 4.48,11.67 ; 7.237,-8.937 7.866,-9.714 ; 7.695,8.546 8.364,9.289
  Mid-Layer 1 lines w0.5: -19.497,6.335 -22.615,4.191 -22.615,-4.191 -19.497,-6.335 -18.783,-6.103 ; -19.318,-4.106 -20.052,-4.262 -21.235,-3.363 -21.235,3.363 -20.052,4.262 -19.318,4.106 ; -19.077,-5.112 -19.801,-5.306 -21.929,-3.768 -21.929,3.768 -19.801,5.306 -19.077,5.112 ; -12.429,15.349 -12.901,15.931 -12.14,19.24 -10.593,20.133 -7.347,19.138 -7.078,18.438 ; -12.25,0 -11.996,0.314 ; -12.233,0.641 -11.996,0.314 ; -11.609,15.978 -12.05,16.585 -11.495,18.758 -10.497,19.334 -8.338,18.728 -8.033,18.042 ; -11.496,0.301 -11.996,0.314 ; -11.358,-1.799 -10.76,-1.194 -10.683,1.755 -11.249,2.391 ; -10.757,16.564 -11.165,17.193 -10.865,18.262 -10.383,18.54 -9.307,18.266 -8.966,17.597 ; -9.875,-17.104 -10.25,-17.753 -9.264,-23.22 ; -6.672,-10.274 -6.27,-10.232 ; -6.125,-10.609 -6.27,-10.232 ; -6.125,10.609 -5.726,10.546 ; -6.009,-9.805 -6.27,-10.232 ; -5.561,10.915 -5.726,10.546 ; -5.487,10.106 -5.726,10.546 ; 3.554,-10.937 3.822,-10.129 6.414,-8.722 7.237,-8.937 ; 4.106,-19.318 4.262,-20.052 7.678,-21.681 14.937,-17.489 15.234,-13.717 14.677,-13.215 ; 4.106,19.318 4.262,20.052 7.678,21.681 14.937,17.489 15.234,13.717 14.677,13.215 ; 4.121,10.736 4.346,9.915 6.861,8.374 7.695,8.546 ; 5.112,-19.077 5.306,-19.801 7.701,-20.875 14.227,-17.107 14.496,-14.496 13.965,-13.965 ; 5.112,19.077 5.306,19.801 7.701,20.875 14.227,17.107 14.496,14.496 13.965,13.965 ; 5.487,-10.106 5.726,-10.546 ; 5.561,-10.915 5.726,-10.546 ; 6.009,9.805 6.27,10.232 ; 6.103,-18.783 6.335,-19.497 7.705,-20.072 13.53,-16.709 13.717,-15.234 13.215,-14.677 ; 6.103,18.783 6.335,19.497 7.705,20.072 13.53,16.709 13.717,15.234 13.215,14.677 ; 6.125,-10.609 5.726,-10.546 ; 6.125,10.609 6.27,10.232 ; 6.672,10.274 6.27,10.232 ; 11.496,-0.301 11.996,-0.314 ; 12.233,-0.641 11.996,-0.314 ; 12.25,0 11.996,-0.314 ; 17.104,9.875 17.753,10.25 23.339,8.959 ; 18.783,-6.103 19.497,-6.335 22.615,-4.191 22.615,4.191 19.497,6.335 18.783,6.103 ; 19.077,-5.112 19.318,-5.176 19.801,-5.306 21.929,-3.768 21.929,3.768 19.801,5.306 19.077,5.112 ; 19.318,-4.106 20.052,-4.262 21.235,-3.363 21.235,3.363 20.052,4.262 19.318,4.106
  Mid-Layer 1 lines w1: -9.264,-23.22 ccw(c0,0) 23.339,8.959 cw(c0,0) -9.264,-23.22
  Mid-Layer 2 lines w0.2: -20.5,0 -12.25,0 ; -20.472,-1.073 -11.484,-0.602 ; -20.472,1.073 -12.233,0.641 ; -20.388,-2.143 -11.934,-1.254 ; -20.388,2.143 -11.437,1.202 ; -20.248,-3.207 -11.358,-1.799 ; -20.248,3.207 -11.852,1.877 ; -20.052,-4.262 -11.738,-2.495 ; -20.052,4.262 -11.249,2.391 ; -19.801,-5.306 -11.108,-2.976 ; -19.801,5.306 -11.591,3.106 ; -19.497,-6.335 -11.413,-3.708 ; -19.497,6.335 -10.937,3.554 ; -19.138,-7.347 -10.736,-4.121 ; -19.138,7.347 -11.203,4.3 ; -18.728,-8.338 -10.963,-4.881 ; -18.728,8.338 -10.506,4.677 ; -18.266,-9.307 -10.247,-5.221 ; -18.266,9.307 -10.692,5.448 ; -17.754,-10.25 -10.392,-6 ; -17.754,10.25 -9.959,5.75 ; -17.193,-11.165 -9.645,-6.263 ; -17.193,11.165 -10.064,6.536 ; -16.585,-12.05 -9.708,-7.053 ; -16.585,12.05 -9.304,6.76 ; -15.931,-12.901 -8.937,-7.237 ; -15.931,12.901 -9.326,7.552 ; -15.234,-13.717 -8.918,-8.03 ; -15.234,13.717 -8.546,7.695 ; -14.496,-14.496 -8.132,-8.132 ; -14.496,14.496 -8.485,8.485 ; -13.717,-15.234 -8.03,-8.918 ; -13.717,15.234 -7.695,8.546 ; -12.901,-15.931 -7.237,-8.937 ; -12.901,15.931 -7.552,9.326 ; -12.05,-16.585 -7.053,-9.708 ; -12.05,16.585 -6.76,9.304 ; -11.165,-17.193 -6.672,-10.274 ; -11.165,17.193 -6.536,10.064 ; -10.25,-17.754 -6.125,-10.609 ; -10.25,17.754 -6.125,10.609 ; -9.307,-18.266 -5.448,-10.692 ; -9.307,18.266 -5.561,10.915 ; -8.338,-18.728 -4.677,-10.506 ; -8.338,18.728 -4.881,10.963 ; -7.347,-19.138 -4.3,-11.203 ; -7.347,19.138 -4.121,10.736 ; -6.335,-19.497 -3.554,-10.937 ; -6.335,19.497 -3.708,11.413 ; -5.306,-19.801 -3.106,-11.591 ; -5.306,19.801 -2.976,11.108 ; -4.262,-20.052 -2.391,-11.249 ; -4.262,20.052 -2.495,11.738 ; -3.207,-20.248 -1.877,-11.852 ; -3.207,20.248 -1.799,11.358 ; -2.143,-20.388 -1.202,-11.437 ; -2.143,20.388 -1.254,11.934 ; -1.073,-20.472 -0.628,-11.984 ; -1.073,20.472 -0.602,11.484 ; 0,-20.5 0,-11.5 ; 0,12 0,20.5 ; 0.602,11.484 1.073,20.472 ; 0.628,-11.984 1.073,-20.472 ; 1.202,-11.437 2.143,-20.388 ; 1.254,11.934 2.143,20.388 ; 1.799,11.358 3.207,20.248 ; 1.877,-11.852 3.207,-20.248 ; 2.391,-11.249 4.262,-20.052 ; 2.495,11.738 4.262,20.052 ; 2.976,11.108 5.306,19.801 ; 3.106,-11.591 5.306,-19.801 ; 3.554,-10.937 6.335,-19.497 ; 3.708,11.413 6.335,19.497 ; 4.121,10.736 7.347,19.138 ; 4.3,-11.203 7.347,-19.138 ; 4.677,-10.506 8.338,-18.728 ; 4.881,10.963 8.338,18.728 ; 5.221,10.247 9.307,18.266 ; 5.561,-10.915 9.307,-18.266 ; 6.125,-10.609 10.25,-17.754 ; 6.125,10.609 10.25,17.754 ; 6.263,-9.645 11.165,-17.193 ; 6.672,10.274 11.165,17.193 ; 6.76,9.304 12.05,16.585 ; 7.053,-9.708 12.05,-16.585 ; 7.237,-8.937 12.901,-15.931 ; 7.552,9.326 12.901,15.931 ; 7.695,8.546 13.717,15.234 ; 8.03,-8.918 13.717,-15.234 ; 8.132,-8.132 14.496,-14.496 ; 8.485,8.485 14.496,14.496 ; 8.546,7.695 15.234,13.717 ; 8.918,-8.03 15.234,-13.717 ; 8.937,-7.237 15.931,-12.901 ; 9.304,6.76 16.585,12.05 ; 9.326,7.552 15.931,12.901 ; 9.645,-6.263 17.193,-11.165 ; 9.708,-7.053 16.585,-12.05 ; 9.959,5.75 17.754,10.25 ; 10.064,6.536 17.193,11.165 ; 10.247,-5.221 18.266,-9.307 ; 10.392,-6 17.754,-10.25 ; 10.506,4.677 18.728,8.338 ; 10.692,5.448 18.266,9.307 ; 10.736,-4.121 19.138,-7.347 ; 10.937,3.554 19.497,6.335 ; 10.963,-4.881 18.728,-8.338 ; 11.108,-2.976 19.801,-5.306 ; 11.203,4.3 19.138,7.347 ; 11.249,2.391 20.052,4.262 ; 11.358,-1.799 20.248,-3.207 ; 11.413,-3.708 19.497,-6.335 ; 11.437,1.202 20.388,2.143 ; 11.591,3.106 19.801,5.306 ; 11.738,-2.495 20.052,-4.262 ; 11.852,1.877 20.248,3.207 ; 11.934,-1.254 20.388,-2.143 ; 11.984,0.628 20.472,1.073 ; 12.233,-0.641 20.472,-1.073 ; 12.25,0 20.5,0
  Mid-Layer 2 lines w0.25: -11.934,-1.254 -11.274,-1.185 -10.899,-0.792 -10.842,1.362 -11.196,1.773 -11.852,1.877 ; -11.413,-3.708 -10.462,-3.399 -9.682,-2.087 -9.56,2.591 -10.269,3.942 -11.203,4.3 ; -8.937,-7.237 -8.16,-6.608 -6.643,-6.942 -3.17,-9.071 -2.183,-10.271 -2.391,-11.249 ; -8.918,-8.03 -8.175,-7.36 -6.612,-7.524 -3.483,-9.441 -2.808,-10.481 -3.106,-11.591 ; -8.546,7.695 -7.803,7.026 -6.271,7.281 -2.691,9.224 -1.643,10.371 -1.799,11.358 ; -8.485,8.485 -7.673,7.673 -6.435,7.737 -3.21,9.488 -2.287,10.76 -2.495,11.738 ; -8.132,-8.132 -7.867,-7.867 -6.748,-8 -3.941,-9.72 -3.414,-10.508 -3.554,-10.937 ; -8.03,-8.918 -7.501,-8.33 -7.002,-8.372 -4.342,-10.002 -4.032,-10.503 -4.3,-11.203 ; -7.695,8.546 -7.393,8.211 -6.447,8.273 -3.554,9.843 -2.88,10.747 -2.976,11.108 ; -7.552,9.326 -7.08,8.743 -6.491,8.761 -3.749,10.249 -3.464,10.661 -3.708,11.413 ; 1.877,-11.852 1.721,-10.865 2.536,-9.574 6.649,-7.341 8.175,-7.36 8.918,-8.03 ; 2.495,11.738 2.287,10.76 3.034,9.429 7.024,6.983 8.549,6.923 9.326,7.552 ; 4.3,-11.203 4.062,-10.583 4.242,-10.07 6.136,-9.042 6.663,-9.171 7.053,-9.708 ; 4.881,10.963 4.611,10.356 4.763,9.835 6.6,8.709 7.134,8.81 7.552,9.326 ; 10.736,-4.121 9.803,-3.763 9.334,-2.282 9.44,1.79 9.986,3.245 10.937,3.554 ; 11.108,-2.976 10.747,-2.88 10.302,-1.844 10.388,1.447 10.807,2.297 11.249,2.391 ; 11.413,-3.708 10.462,-3.399 9.822,-1.964 9.918,1.704 10.481,2.808 11.591,3.106 ; 11.738,-2.495 10.965,-2.331 10.751,-1.878 10.833,1.241 11.112,1.76 11.852,1.877
  Mid-Layer 2 lines w0.35: -12.074,-3.235 -11.108,-2.976 ; -11.888,3.863 -10.937,3.554 ; 2.391,-11.249 2.599,-12.227 ; 2.976,11.108 3.235,12.074 ; 8.132,-8.132 8.839,-8.839 ; 8.546,7.695 9.289,8.364
  Mid-Layer 2 lines w0.5: -18.438,-7.078 -19.138,-7.347 -21.25,-6.161 -21.25,6.161 -19.138,7.347 -18.438,7.078 ; -18.042,-8.033 -18.728,-8.338 -21.965,-6.82 -21.965,6.82 -18.728,8.338 -18.042,8.033 ; -17.597,-8.966 -18.266,-9.307 -22.825,-7.416 -22.825,7.416 -18.266,9.307 -17.597,8.966 ; -17.193,11.165 -17.835,16.059 -4.99,23.475 -1.073,20.472 -1.034,19.723 ; -16.564,-10.757 -17.193,-11.165 -17.835,-16.059 -4.99,-23.475 -1.073,-20.472 -1.034,-19.723 ; -15.978,-11.609 -16.585,-12.05 -16.889,-15.612 -5.076,-22.433 -2.143,-20.388 -2.064,-19.642 ; -15.978,11.609 -16.585,12.05 -16.889,15.612 -5.076,22.433 -2.143,20.388 -2.064,19.642 ; -15.349,-12.429 -15.931,-12.901 -15.96,-15.323 -5.29,-21.483 -3.207,-20.248 -3.09,-19.507 ; -15.349,12.429 -15.931,12.901 -15.96,15.323 -5.29,21.483 -3.207,20.248 -3.09,19.507 ; -12.25,0 -11.996,0.314 ; -12.233,0.641 -11.996,0.314 ; -11.496,0.301 -11.996,0.314 ; -11.108,-2.976 -10.299,-1.716 -10.195,2.253 -10.937,3.554 ; -6.672,-10.274 -6.27,-10.232 ; -6.125,-10.609 -6.27,-10.232 ; -6.125,10.609 -5.726,10.546 ; -6.009,-9.805 -6.27,-10.232 ; -5.561,10.915 -5.726,10.546 ; -5.487,10.106 -5.726,10.546 ; 0,19.75 0,20.5 3.911,24.692 ; 2.391,-11.249 3.147,-9.955 6.635,-8.061 8.132,-8.132 ; 2.976,11.108 3.663,9.777 7.048,7.703 8.546,7.695 ; 5.487,-10.106 5.726,-10.546 ; 5.561,-10.915 5.726,-10.546 ; 6.009,9.805 6.27,10.232 ; 6.125,-10.609 5.726,-10.546 ; 6.125,10.609 6.27,10.232 ; 6.672,10.274 6.27,10.232 ; 7.078,18.438 7.347,19.138 10.593,20.133 12.14,19.24 12.901,15.931 12.429,15.349 ; 8.033,18.042 8.338,18.728 10.497,19.334 11.495,18.758 12.05,16.585 11.609,15.978 ; 8.966,17.597 9.307,18.266 10.383,18.541 10.865,18.262 11.165,17.193 10.757,16.564 ; 9.875,-17.104 10.25,-17.753 15.477,-19.633 ; 11.496,-0.301 11.996,-0.314 ; 12.233,-0.641 11.996,-0.314 ; 12.25,0 11.996,-0.314 ; 17.597,-8.966 18.266,-9.307 22.825,-7.416 22.825,7.416 18.266,9.307 17.597,8.966 ; 18.042,-8.033 18.728,-8.338 21.965,-6.82 21.965,6.82 18.728,8.338 18.042,8.033 ; 18.438,-7.078 19.138,-7.347 21.25,-6.161 21.25,6.161 19.138,7.347 18.438,7.078
  Mid-Layer 2 lines w1: 3.911,24.692 cw(c0,0) 15.477,-19.633 ccw(c0,0) 3.911,24.692
  Bottom Layer lines w0.2: -20.5,0 -12.25,0 ; -20.472,-1.073 -11.484,-0.602 ; -20.472,1.073 -12.233,0.641 ; -20.388,-2.143 -11.934,-1.254 ; -20.388,2.143 -11.437,1.202 ; -20.248,-3.207 -11.358,-1.799 ; -20.248,3.207 -11.852,1.877 ; -20.052,-4.262 -11.738,-2.495 ; -20.052,4.262 -11.249,2.391 ; -19.801,-5.306 -11.108,-2.976 ; -19.801,5.306 -11.591,3.106 ; -19.497,-6.335 -11.413,-3.708 ; -19.497,6.335 -10.937,3.554 ; -19.138,-7.347 -10.736,-4.121 ; -19.138,7.347 -11.203,4.3 ; -18.728,-8.338 -10.963,-4.881 ; -18.728,8.338 -10.506,4.677 ; -18.266,-9.307 -10.247,-5.221 ; -18.266,9.307 -10.692,5.448 ; -17.754,-10.25 -10.392,-6 ; -17.754,10.25 -9.959,5.75 ; -17.193,-11.165 -9.645,-6.263 ; -17.193,11.165 -10.064,6.536 ; -16.585,-12.05 -9.708,-7.053 ; -16.585,12.05 -9.304,6.76 ; -15.931,-12.901 -8.937,-7.237 ; -15.931,12.901 -9.326,7.552 ; -15.234,-13.717 -8.918,-8.03 ; -15.234,13.717 -8.546,7.695 ; -14.496,-14.496 -8.132,-8.132 ; -14.496,14.496 -8.485,8.485 ; -13.717,-15.234 -8.03,-8.918 ; -13.717,15.234 -7.695,8.546 ; -12.901,-15.931 -7.237,-8.937 ; -12.901,15.931 -7.552,9.326 ; -12.05,-16.585 -7.053,-9.708 ; -12.05,16.585 -6.76,9.304 ; -11.165,-17.193 -6.672,-10.274 ; -11.165,17.193 -6.536,10.064 ; -10.25,-17.754 -6.125,-10.609 ; -10.25,17.754 -6.125,10.609 ; -9.307,-18.266 -5.448,-10.692 ; -9.307,18.266 -5.561,10.915 ; -8.338,-18.728 -4.677,-10.506 ; -8.338,18.728 -4.881,10.963 ; -7.347,-19.138 -4.3,-11.203 ; -7.347,19.138 -4.121,10.736 ; -6.335,-19.497 -3.554,-10.937 ; -6.335,19.497 -3.708,11.413 ; -5.306,-19.801 -3.106,-11.591 ; -5.306,19.801 -2.976,11.108 ; -4.262,-20.052 -2.391,-11.249 ; -4.262,20.052 -2.495,11.738 ; -3.207,-20.248 -1.877,-11.852 ; -3.207,20.248 -1.799,11.358 ; -2.143,-20.388 -1.202,-11.437 ; -2.143,20.388 -1.254,11.934 ; -1.073,-20.472 -0.628,-11.984 ; -1.073,20.472 -0.602,11.484 ; 0,-20.5 0,-11.5 ; 0,12 0,20.5 ; 0.602,11.484 1.073,20.472 ; 0.628,-11.984 1.073,-20.472 ; 1.202,-11.437 2.143,-20.388 ; 1.254,11.934 2.143,20.388 ; 1.799,11.358 3.207,20.248 ; 1.877,-11.852 3.207,-20.248 ; 2.391,-11.249 4.262,-20.052 ; 2.495,11.738 4.262,20.052 ; 2.976,11.108 5.306,19.801 ; 3.106,-11.591 5.306,-19.801 ; 3.554,-10.937 6.335,-19.497 ; 3.708,11.413 6.335,19.497 ; 4.121,10.736 7.347,19.138 ; 4.3,-11.203 7.347,-19.138 ; 4.677,-10.506 8.338,-18.728 ; 4.881,10.963 8.338,18.728 ; 5.221,10.247 9.307,18.266 ; 5.561,-10.915 9.307,-18.266 ; 6.125,-10.609 10.25,-17.754 ; 6.125,10.609 10.25,17.754 ; 6.263,-9.645 11.165,-17.193 ; 6.672,10.274 11.165,17.193 ; 6.76,9.304 12.05,16.585 ; 7.053,-9.708 12.05,-16.585 ; 7.237,-8.937 12.901,-15.931 ; 7.552,9.326 12.901,15.931 ; 7.695,8.546 13.717,15.234 ; 8.03,-8.918 13.717,-15.234 ; 8.132,-8.132 14.496,-14.496 ; 8.485,8.485 14.496,14.496 ; 8.546,7.695 15.234,13.717 ; 8.918,-8.03 15.234,-13.717 ; 8.937,-7.237 15.931,-12.901 ; 9.304,6.76 16.585,12.05 ; 9.326,7.552 15.931,12.901 ; 9.645,-6.263 17.193,-11.165 ; 9.708,-7.053 16.585,-12.05 ; 9.959,5.75 17.754,10.25 ; 10.064,6.536 17.193,11.165 ; 10.247,-5.221 18.266,-9.307 ; 10.392,-6 17.754,-10.25 ; 10.506,4.677 18.728,8.338 ; 10.692,5.448 18.266,9.307 ; 10.736,-4.121 19.138,-7.347 ; 10.937,3.554 19.497,6.335 ; 10.963,-4.881 18.728,-8.338 ; 11.108,-2.976 19.801,-5.306 ; 11.203,4.3 19.138,7.347 ; 11.249,2.391 20.052,4.262 ; 11.358,-1.799 20.248,-3.207 ; 11.413,-3.708 19.497,-6.335 ; 11.437,1.202 20.388,2.143 ; 11.591,3.106 19.801,5.306 ; 11.738,-2.495 20.052,-4.262 ; 11.852,1.877 20.248,3.207 ; 11.934,-1.254 20.388,-2.143 ; 11.984,0.628 20.472,1.073 ; 12.233,-0.641 20.472,-1.073 ; 12.25,0 20.5,0
  Bottom Layer lines w0.25: -11.738,-2.495 -11.104,-2.36 -10.804,-2.065 -10.681,2.627 -10.965,2.938 -11.591,3.106 ; -10.963,-4.881 -10.049,-4.474 -9.679,-3.682 -9.473,4.184 -9.801,4.994 -10.692,5.448 ; -10.392,-6 -9.188,-5.305 -0.551,-10.52 -0.628,-11.984 ; -10.064,6.536 -8.835,5.737 0,10.609 0,12 ; -9.708,-7.053 -8.92,-6.481 -1.725,-10.89 -1.877,-11.852 ; -9.645,-6.263 -9.053,-5.879 -1.128,-10.735 -1.202,-11.437 ; -9.326,7.552 -8.568,6.939 -1.152,10.965 -1.254,11.934 ; -9.304,6.76 -8.733,6.345 -0.565,10.779 -0.602,11.484 ; 0.628,-11.984 0.576,-10.985 1.113,-10.296 8.029,-6.541 8.899,-6.466 9.708,-7.053 ; 1.254,11.934 1.15,10.94 1.651,10.224 8.36,6.112 9.225,5.991 10.064,6.536 ; 3.106,-11.591 2.938,-10.965 3.065,-10.564 7.19,-8.324 7.596,-8.436 8.03,-8.918 ; 3.708,11.413 3.508,10.796 3.614,10.389 7.616,7.937 8.027,8.027 8.485,8.485 ; 10.247,-5.221 9.618,-4.9 9.861,4.39 10.506,4.677 ; 10.392,-6 9.188,-5.305 9.386,4.782 10.692,5.448 ; 10.963,-4.881 10.072,-4.484 10.293,3.951 11.203,4.3
  Bottom Layer lines w0.35: -11.67,-4.48 -10.736,-4.121 ; -11.419,5.084 -10.506,4.677 ; -7.866,-9.714 -7.237,-8.937 ; -7.347,10.113 -6.76,9.304 ; -5.084,-11.419 -4.677,-10.506 ; -4.48,11.67 -4.121,10.736 ; 1.202,-11.437 1.307,-12.431 ; 1.799,11.358 1.955,12.346 ; 8.937,-7.237 9.714,-7.866 ; 9.304,6.76 10.113,7.347 ; 11.358,-1.799 12.346,-1.955 ; 11.437,1.202 12.431,1.307
  Bottom Layer lines w0.5: -19.723,-1.034 -20.472,-1.073 -21.248,-0.278 -21.248,0.278 -20.472,1.073 -19.723,1.034 ; -19.642,-2.064 -20.388,-2.143 -21.992,-0.576 -21.992,0.576 -20.388,2.143 -19.642,2.064 ; -19.507,-3.09 -20.248,-3.207 -22.732,-0.893 -22.732,0.893 -20.248,3.207 -19.507,3.09 ; -19.429,15.733 -17.754,10.25 -17.104,9.875 ; -14.677,13.215 -15.234,13.717 -14.937,17.489 -7.678,21.681 -4.262,20.052 -4.106,19.318 ; -13.965,13.965 -14.496,14.496 -14.227,17.107 -7.701,20.875 -5.306,19.801 -5.112,19.077 ; -13.215,14.677 -13.717,15.234 -13.53,16.709 -7.705,20.072 -6.335,19.497 -6.103,18.783 ; -12.429,-15.349 -12.901,-15.931 -12.14,-19.24 -10.593,-20.133 -7.347,-19.138 -7.078,-18.438 ; -12.25,0 -11.996,0.314 ; -12.233,0.641 -11.996,0.314 ; -11.609,-15.978 -12.05,-16.585 -11.495,-18.758 -10.497,-19.334 -8.338,-18.728 -8.033,-18.042 ; -11.496,0.301 -11.996,0.314 ; -10.757,-16.564 -11.165,-17.193 -10.865,-18.262 -10.383,-18.541 -9.307,-18.266 -8.966,-17.597 ; -10.736,-4.121 -10.267,-3.263 -10.082,3.796 -10.506,4.677 ; -7.237,-8.937 -7.101,-8.769 -6.579,-8.635 -4.723,-9.773 -4.599,-10.328 -4.677,-10.506 ; -6.76,9.304 -6.645,9.147 -6.102,8.976 -4.189,10.015 -4.044,10.534 -4.121,10.736 ; -6.672,-10.274 -6.27,-10.232 ; -6.125,-10.609 -6.27,-10.232 ; -6.125,10.609 -5.726,10.546 ; -6.009,-9.805 -6.27,-10.232 ; -5.561,10.915 -5.726,10.546 ; -5.487,10.106 -5.726,10.546 ; 1.034,19.723 1.073,20.472 4.99,23.475 17.835,16.059 17.193,11.165 16.564,10.757 ; 1.202,-11.437 1.754,-10.63 7.96,-7.26 8.937,-7.237 ; 1.799,11.358 2.308,10.523 8.329,6.834 9.304,6.76 ; 2.064,19.642 2.143,20.388 5.076,22.433 16.889,15.612 16.585,12.05 15.978,11.609 ; 3.09,19.507 3.207,20.248 5.29,21.483 15.96,15.323 15.931,12.901 15.349,12.429 ; 5.487,-10.106 5.726,-10.546 ; 5.561,-10.915 5.726,-10.546 ; 6.009,9.805 6.27,10.232 ; 6.125,-10.609 5.726,-10.546 ; 6.125,10.609 6.27,10.232 ; 6.672,10.274 6.27,10.232 ; 7.078,-18.438 7.347,-19.138 10.593,-20.133 12.14,-19.24 12.901,-15.931 12.429,-15.349 ; 8.033,-18.042 8.338,-18.728 10.497,-19.334 11.495,-18.758 12.05,-16.585 11.609,-15.978 ; 8.966,-17.597 9.307,-18.266 10.383,-18.541 10.865,-18.262 11.165,-17.193 10.757,-16.564 ; 11.358,-1.799 11.145,-1.765 10.768,-1.38 10.825,0.796 11.244,1.182 11.437,1.202 ; 11.496,-0.301 11.996,-0.314 ; 12.233,-0.641 11.996,-0.314 ; 12.25,0 11.996,-0.314 ; 19.75,0 20.5,0 24.741,3.587
  Bottom Layer lines w1: -19.429,15.733 cw(c0,0) 24.741,3.587 ccw(c0,0) -19.429,15.733
R0402 [mm] "Chip Resistor, 2-Leads, Body 1.00x0.50mm, IPC Medium Density"
  rrect50% 0.6x0.55 smd mask+0.05: 1(-0.45,0) 2(0.45,0)
  body extent -0.53,-0.28 0.53,0.28, height 0.25
SOT23_torex [mm] "SOT23, 3-Leads, Body 2.90x2.80mm, Pitch 0.95mm, IPC Medium Density"
  rrect50% 1x0.6 smd: 1(-1.35,0.95) 2(-1.35,-0.95) 3(1.35,0)
  silkscreen extent -1.47,-1.55 0.85,1.93, body extent -1.5,-1.55 1.5,1.55, height 1.25
SOT95P237X112-3N [mm] "SOT23, 3-Leads, Body 2.92x2.37mm, Pitch 0.95mm, IPC Medium Density"
  rrect50% 1x0.6 smd: 1(-1.2,0.95) 2(-1.2,-0.95) 3(1.2,0)
  silkscreen extent -1.32,-1.5 0.7,1.92, body extent -1.32,-1.52 1.32,1.52, height 1.12
TestingPoint_1mm [mm]
  round 1 smd paste-1: 1(0,0)
TSSOP20_ST [mm] "TSOP, 20-Leads, Body 6.50x4.40mm, Pitch 0.65mm, IPC Medium Density"
  oval 1.4x0.45 smd: 1(-2.95,2.925) 2(-2.95,2.275) 3(-2.95,1.625) 4(-2.95,0.975) 5(-2.95,0.325) 6(-2.95,-0.325) 7(-2.95,-0.975) 8(-2.95,-1.625) 9(-2.95,-2.275) 10(-2.95,-2.925) 11(2.95,-2.925) 12(2.95,-2.275) 13(2.95,-1.625) 14(2.95,-0.975) 15(2.95,-0.325) 16(2.95,0.325) 17(2.95,0.975) 18(2.95,1.625) 19(2.95,2.275) 20(2.95,2.925)
  silkscreen extent -3.08,-3.3 1.85,3.82, body extent -3.2,-3.3 3.2,3.3, height 1.2
TYPE-C-31-M-12 [mm] "5A 1 16P Female Type-C SMD  USB Connectors ROHS"
  rrect50% 0.6x1.14 smd: A1B12(-3.2,6.86) A4B9(-2.4,6.86) B1A12(3.2,6.86) B4A9(2.4,6.86)
  rrect50% 0.3x1.14 smd: A5(-1.25,6.86) A6(-0.25,6.86) A7(0.25,6.86) A8(1.25,6.86) B5(1.75,6.86) B6(0.75,6.86) B7(-0.75,6.86) B8(-1.75,6.86)
  rrect50% 0x0 hole 0.6: H(-2.89,5.79) H(2.89,5.79)
  oval 1x1.8 hole 0.6 slot 1.4 at 90 deg: M1(-4.325,2.11) M1(4.325,2.11)
  oval 1x2.1 hole 0.6 slot 1.7 at 90 deg: M1(-4.325,6.29) M1(4.325,6.29)
  body extent -4.45,-0.49 4.49,7.41, height 3.21
USBLC6-2SC6 [mm]
  rrect50% 1x0.6 smd: 1(-1.375,0.95) 2(-1.375,0) 3(-1.375,-0.95) 4(1.375,-0.95) 5(1.375,0) 6(1.375,0.95)
  silkscreen extent -2.22,-1.55 0.5,1.83, body extent -1.6,-1.53 1.6,1.53, height 1.45